# Altium PCB BD4_dy_V1.0.PcbDoc (part 2 of 2)
Units mil, origin at the board's own origin, x right, y up, seen from the top; angles counter-clockwise.
Board outline 5358.3 x 5259.87 mil, 4 copper layers (Top Layer, Signal Layer 1, Signal Layer 2, Bottom Layer), stack 30.634 mil thick; 170 components, 120 nets, 593 pads, 159 vias.
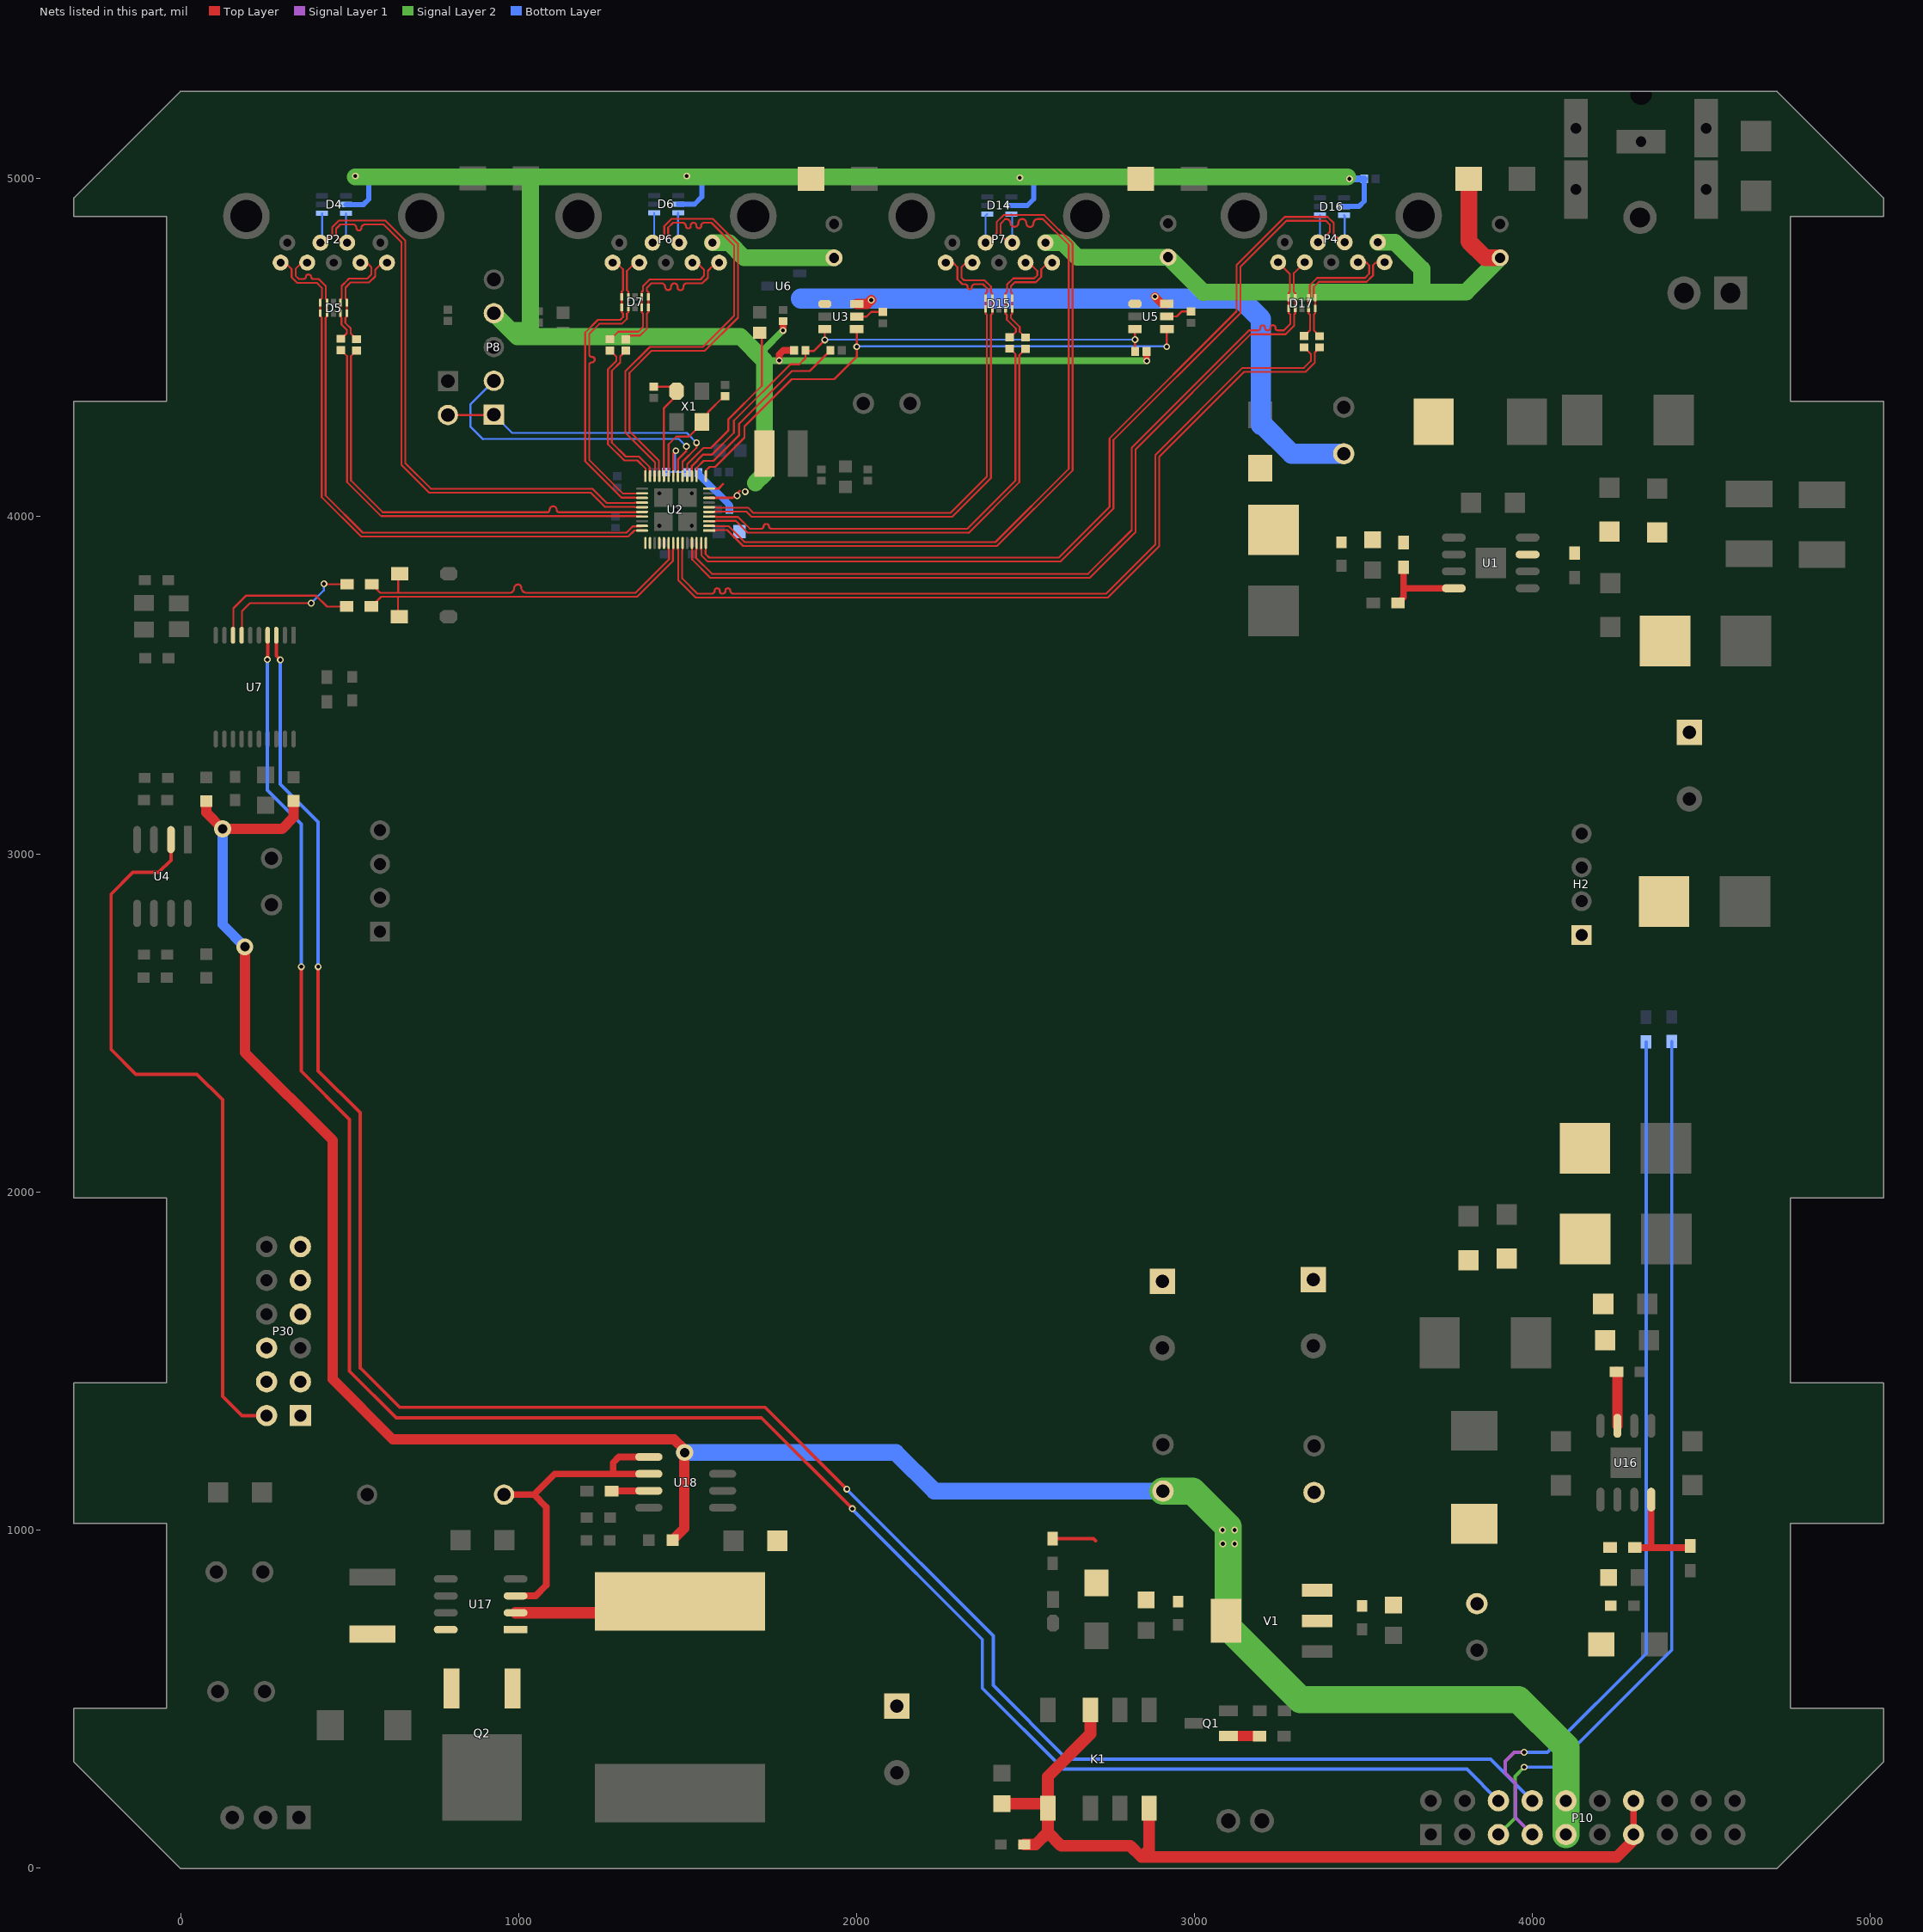
[diagram p4: the nets of this part, all layers, seen from the top]

## Via types
v1: diameter 20, hole 12, Top Layer to Bottom Layer, 141 vias
v2: diameter 24, hole 12, Top Layer to Bottom Layer, 8 vias
v3: diameter 50, hole 28, Top Layer to Bottom Layer, 5 vias
v4: diameter 20, hole 12, Top Layer to Bottom Layer, tented both sides, 5 vias

## Nets (pads, with @x,y where several pads share a name; then routed paths per layer and width w, separated by ;. In a path a pad name is that pad's centre, name@x,y a point inside that pad or via, vN(x,y) a via of type N, cw(c..) or ccw(c..) an arc to the next point about the centre after c; other vN are vias at no path point) (continued)
NetP10_5: P10.5 R19.2 | length 2612.4
  Signal Layer 2 w10: P10.5@3900.79,98.43 3950,147.64 3950,271 v1(3977,298)
  Bottom Layer w10: v1(3977,298) 4067,298 4414,645 R19.2@4414,2445.5
NetP10_6: P10.6 U7.4 | length 6292.2
  Top Layer w10: v1(256.46,3576) 257.23,3576.77 U7.4@257.23,3648 ; v1(357,2667) 357,2358 500,2215 500,1470 638,1332 1719,1332 v1(1988,1063)
  Bottom Layer w10: v1(256.46,3576) 256.46,3189.54 357,3089 v1(357,2667) ; v1(1988,1063) 1988,1061 2373,676 2373,532 2613,292 3807.21,292 P10.6@3900.79,198.43
NetP10_7: P10.7 R18.2 | length 2617.9
  Signal Layer 1 w10: v1(3977,342) 3948,342 3921,315 3921,281 3951,251 3951,148.21 P10.7@4000.79,98.43
  Bottom Layer w10: v1(3977,342) 4046,342 4338,634 R18.2@4338,2444.5 ; P10.7@4000.79,98.43 P10.7@4009.43,98.43
NetP10_8: P10.8 U7.3 | length 6358.1
  Top Layer w10: U7.3@282.82,3648 282.82,3587.18 v1(295,3575) ; v1(407,2667) 407,2359 531,2235 531,1480 648,1363 1730,1363 v1(1972,1121)
  Bottom Layer w10: v1(295,3575) 295,3207.31 407,3095.31 v1(407,2667) ; v1(1972,1121) 1972,1120 2405,687 2405,540 2623,322 3877.21,322 P10.8@4000.79,198.43
NetQ1_1: Q1.1 R13.2 | length 92
  Top Layer w30: Q1.1@3101.69,390.35 3102.04,390 R13.2@3193.5,390
NetQ2_1: Q2.1 U17.1
NetQ2_3: Q2.3 R47.1 U17.8
NetR2_2: R2.2 R3.1 U1.4 | length 261.2
  Top Layer w20: R3.1@3603.5,3744 3620,3760.5 3620,3787 ; R2.2@3620,3849.5 3620,3787 ; U1.4@3768.85,3787 3620,3787
NetR6_1: R6.1 U3.5 | length 82.4
  Top Layer w6: U3.5@2001.24,4591.27 2030.27,4591.27 2044,4605 R6.1@2078,4605
NetR8_1: R8.1 U5.5 | length 77.5
  Top Layer w6: U5.5@2919.49,4591.6 2948.6,4591.6 2963,4606 R8.1@2991,4606
NetR16_1: R16.1 U7.8 | length 444.6
  Top Layer w6: U7.8@154.87,3648 155.93,3649.06 155.93,3727.93 193,3765 401,3765 433,3733 R16.1@491.5,3733
NetR17_1: R17.1 U7.7 | length 427.8
  Top Layer w6: U7.7@180.46,3648 181.52,3649.06 181.52,3719.52 205,3743 v1(386,3743) ; v1(424,3800) 425,3799 R17.1@492.5,3799
  Bottom Layer w6: v1(386,3743) 424,3781 v1(424,3800)
NetR43_2: R43.2 R44.1 U16.4 | length 310.3
  Top Layer w20: R43.2@4304.5,948 4348,948 ; U16.4@4353,1089.85 4353,953 4348,948 ; R44.1@4469,952.5 4464.5,948 4348,948
NetR45_2: R45.2 U17.3 U18.5 U18.6 | length 987
  Top Layer w19.68: R45.2@957.26,1104.45 1045.55,1104.45 ; U17.3@991.35,805 1051,805 1082,836 1082,1068 1045.55,1104.45 ; U18.6@1385.85,1166 1280,1166 ; U18.5@1385.85,1216 1297,1216 1280,1199 1280,1166 ; 1045.55,1104.45 1107.1,1166 1280,1166
NetR48_1: R48.1 U18.7 | length 110.8
  Top Layer w20: R48.1@1275.5,1115 1276.5,1116 U18.7@1385.85,1116
OLED_CS: P30.7
OLED_DC: P30.9
OLED_RES: P30.11
OVCUR#: R7.2 R9.2 U2.14 U3.3 U5.3 | length 1628.9
  Top Layer w6: U2.14@1513.23,4118.98 1513.23,4149.23 1547,4183 1573,4183 1637.7,4247.7 1637.7,4283.1 1804.6,4450 1831,4450 1849.46,4468.46 1849.46,4489 1873.75,4489 v1(1906.75,4522) U3.3@1906.75,4553.87 ; U5.3@2825,4554.2 v1(2825,4523) 2825,4488.54 R9.2@2825.54,4488
  Bottom Layer w6: v1@1906.75,4523 v1(2825,4523) v1@2824,4522
P1_AS_DX_N: D6.6 P6.2 U2.22 | length 1369.1
  Top Layer w5.59: U2.22@1402.99,4118.98 1402.99,4139.51 1404.09,4140.6 1404.09,4159.72 1316.61,4247.2 1316.61,4429.21 1388.69,4501.29 1546.4,4501.29 1637.9,4592.8 1637.9,4801.8 1570.7,4869 1549.2,4869 ccw(c1549.2,4860.8) 1541,4860.8 1541,4859.2 cw(c1534.3,4859.2) 1534.3,4852.5 1533.5,4852.5 cw(c1533.5,4859.6) 1526.4,4859.6 1526.4,4861.3 ccw(c1518.7,4861.3) 1518.7,4869 1517.7,4869 ccw(c1517.7,4860.9) 1509.6,4860.9 1509.6,4858.3 cw(c1503.5,4858.3) 1503.5,4852.2 1502.3,4852.2 cw(c1502.3,4859.1) 1495.4,4859.1 ccw(c1485.5,4859.1) 1485.5,4869 1457.7,4869 1443,4854.3 1443,4830.2 1463.2,4810 P6.2@1475.57,4810
  Bottom Layer w5.59: D6.6@1472.43,4898.41 1472.43,4813.14 P6.2@1475.57,4810
P1_AS_DX_P: D6.1 P6.3 U2.21 | length 1369.6
  Top Layer w5.59: P6.3@1396.83,4810 1411.21,4810 1431.41,4830.2 1431.41,4859.1 1452.9,4880.59 1575.5,4880.59 1646.1,4809.99 1649.49,4806.6 1649.49,4587.99 1551.2,4489.7 1393.49,4489.7 1328.2,4424.41 1328.2,4252 1415.68,4164.52 1415.68,4140.6 1416.77,4139.51 U2.21@1416.77,4118.98
  Bottom Layer w5.59: P6.3@1396.83,4810 1401.57,4814.74 D6.1@1401.57,4898.41
P1_SS_RX_N: D7.2 D7.9 P6.6 U2.26 | length 895.4
  Top Layer w5.59: U2.26@1349.08,4067.8 1348.47,4067.19 1309.41,4067.19 1209.1,4167.5 1209.1,4447.8 cw(c1216.6,4447.8) 1216.6,4455.3 ccw(c1216.6,4464.3) 1225.6,4464.3 ccw(c1218.21,4464.3) 1218.21,4471.69 1216.93,4471.69 cw(c1216.93,4479.52) 1209.1,4479.52 1209.1,4539.4 1239.5,4569.8 1305.9,4569.8 1320.79,4584.69 1320.79,4599.9 1325.2,4604.31 1325.32,4604.31 D7.2@1325.32,4618.25 D7.9@1325.32,4649.75 1325.32,4664.78 1321,4669.1 1321,4726.1 1345.84,4750.94 P6.6@1357.46,4750.94
P1_SS_RX_P: D7.1 D7.10 P6.5 U2.27 | length 895.7
  Top Layer w5.59: P6.5@1278.72,4750.94 1289.26,4750.94 1309.41,4730.79 1309.41,4669.51 1305.63,4665.73 D7.10@1305.63,4649.75 D7.1@1305.63,4618.25 1305.63,4604.31 1309.2,4600.74 1309.2,4589.49 1301.1,4581.39 1234.7,4581.39 1197.51,4544.2 1197.51,4162.7 1200.9,4159.3 1304.31,4055.9 1304.61,4055.6 1349.4,4055.6 1349.9,4055.1 U2.27@1353.3,4055.1
P1_SS_TX_N: C38.2 U2.23 | length 456.6
  Top Layer w5.59: C38.2@1314.34,4490.34 1314.34,4486.54 1301.19,4473.39 1301.19,4455.39 1276.39,4430.59 1276.39,4218.21 1317.81,4176.79 1356.7,4176.79 1388.09,4145.4 1388.09,4133.81 1389.21,4132.69 U2.23@1389.21,4118.98
P1_SS_TX_P: C36.2 U2.24 | length 459.4
  Top Layer w5.59: C36.2@1271,4490.54 1271.66,4490.54 1289.6,4472.6 1289.6,4460.19 1264.8,4435.39 1264.8,4213.41 1313.01,4165.2 1351.9,4165.2 1376.5,4140.6 1376.5,4133.2 1375.43,4132.13 U2.24@1375.43,4118.98
P1C_N: C38.1 D7.5 D7.6 P6.9 | length 491.9
  Top Layer w5.59: C38.1@1317.1,4523.8 1328.31,4535.01 1359.61,4535.01 1380.29,4555.69 1380.29,4600.59 1384.37,4604.67 D7.5@1384.37,4618.25 D7.6@1384.37,4649.75 1384.37,4663.43 1380.32,4667.48 1380.32,4676.8 1393.03,4689.51 1423.49,4689.51 cw(c1423.49,4678.8) 1434.2,4678.8 ccw(c1443.3,4678.8) 1443.3,4669.7 ccw(c1443.3,4678) 1451.6,4678 1451.6,4679.71 cw(c1461.4,4679.71) 1461.4,4689.51 cw(c1461.4,4680.11) 1470.8,4680.11 1470.8,4677.7 ccw(c1479.3,4677.7) 1479.3,4669.2 ccw(c1479.3,4678.1) 1488.2,4678.1 1488.2,4679.91 cw(c1497.8,4679.91) 1497.8,4689.51 1543.6,4689.51 1560.49,4706.4 1560.49,4726.69 1574.33,4740.53 P6.9@1574.33,4750.94
P1C_P: C36.1 D7.4 D7.7 P6.8 | length 491.4
  Top Layer w5.59: C36.1@1271,4524 1272.6,4524 1295.2,4546.6 1354.81,4546.6 1368.7,4560.49 1368.7,4600.3 1364.69,4604.31 D7.4@1364.69,4618.25 D7.7@1364.69,4649.75 1364.69,4664.19 1368.73,4668.23 1368.73,4681.6 1388.23,4701.1 1538.8,4701.1 1548.9,4711.2 1548.9,4730.4 1528.36,4750.94 P6.8@1514.94,4750.94
P2_AS_DX_N: D14.6 P7.2 U2.2 | length 2292.4
  Top Layer w5.59: U2.2@1564.16,3971.77 1584.68,3971.77 1585.77,3970.68 1622.7,3970.68 1669.58,3923.8 2411.71,3923.8 2628.6,4140.69 2628.6,4803.2 2551.8,4880 2537.8,4880 ccw(c2537.8,4866.4) 2524.2,4866.4 cw(c2514.3,4866.4) 2514.3,4856.5 cw(c2514.3,4867.6) 2503.2,4867.6 ccw(c2490.8,4867.6) 2490.8,4880 ccw(c2490.8,4869.1) 2479.9,4869.1 cw(c2467.5,4869.1) 2467.5,4856.7 cw(c2467.5,4868.1) 2456.1,4868.1 ccw(c2444.2,4868.1) 2444.2,4880 2440.7,4880 2426.9,4866.2 2426.9,4833.1 2450,4810 P7.2@2461.57,4810
  Bottom Layer w5.59: D14.6@2458.43,4894.41 2461.57,4891.27 P7.2@2461.57,4810
P2_AS_DX_P: D14.1 P7.3 U2.1 | length 2292.7
  Top Layer w5.59: U2.1@1564.16,3957.99 1584.68,3957.99 1585.77,3959.09 1617.9,3959.09 1664.78,3912.21 2416.51,3912.21 2640.19,4135.89 2640.19,4808 2556.6,4891.59 2435.9,4891.59 2415.31,4871 2415.31,4837.01 2388.3,4810 P7.3@2382.83,4810
  Bottom Layer w5.59: P7.3@2382.83,4810 2382.83,4889.67 D14.1@2387.57,4894.41
P2_SS_RX_N: D15.1 D15.10 P7.5 U2.6 | length 1626.6
  Top Layer w5.59: U2.6@1564.16,4026.89 1584.68,4026.89 1585.77,4025.8 1679.4,4025.8 1695.11,4010.09 2278.59,4010.09 2386.8,4118.3 2386.8,4596.14 2382.83,4600.11 D15.1@2382.83,4614.05 D15.10@2382.83,4645.55 2382.83,4659.23 2386.88,4663.28 2386.88,4675.1 2374.98,4687 2351.3,4687 ccw(c2351.3,4677.2) 2341.5,4677.2 cw(c2336.2,4677.2) 2336.2,4671.9 cw(c2336.2,4678.6) 2329.5,4678.6 2329.5,4679.5 ccw(c2322,4679.5) 2322,4687 2314.11,4687 2299.41,4701.7 2299.41,4737.39 2285.86,4750.94 P7.5@2264.72,4750.94
P2_SS_RX_P: D15.2 D15.9 P7.6 U2.5 | length 1625.8
  Top Layer w5.59: U2.5@1564.16,4013.11 1584.68,4013.11 1585.77,4014.21 1674.6,4014.21 1690.31,3998.5 2283.39,3998.5 2398.39,4113.5 2398.39,4595.98 2402.52,4600.11 D15.2@2402.52,4614.05 D15.9@2402.52,4645.55 2402.52,4658.88 2398.47,4662.93 2398.47,4679.9 2379.78,4698.59 2318.91,4698.59 2311,4706.5 2311,4736.9 2325.04,4750.94 P7.6@2343.46,4750.94
P2_SS_TX_N: C21.2 U2.4 | length 1398.4
  Top Layer w5.59: U2.4@1564.16,3999.33 1583.58,3999.33 cw(c1583.58,3998.24) 1584.68,3998.24 1649.66,3998.24 1684.41,3963.49 1718.89,3963.49 ccw(c1718.89,3969.9) 1725.3,3969.9 cw(c1732.6,3969.9) 1732.6,3977.2 1735.1,3977.2 cw(c1735.1,3971.3) 1741,3971.3 ccw(c1748.81,3971.3) 1748.81,3963.49 2328.99,3963.49 2471.11,4105.61 2471.11,4479.99 2454.66,4496.44 2453.9,4496.44 C21.2@2450.4,4496.44
P2_SS_TX_P: C23.2 U2.3 | length 1398.5
  Top Layer w5.59: U2.3@1564.16,3985.55 1583.58,3985.55 ccw(c1583.58,3986.65) 1584.68,3986.65 1643.55,3986.65 1678.3,3951.9 2332.21,3951.9 2333,3951.11 2482.7,4100.81 2482.7,4476.94 C23.2@2501.4,4495.64
P2C_N: C23.1 D15.5 D15.6 P7.9 | length 341.6
  Top Layer w5.59: C23.1@2505.4,4529.9 2501.4,4529.9 2500.2,4529.9 2483.69,4546.4 2483.69,4560.6 2457.4,4586.9 2457.4,4595.94 2461.57,4600.11 D15.5@2461.57,4614.05 D15.6@2461.57,4645.55 2461.57,4659.93 2457.52,4663.98 2457.52,4681.02 2469.2,4692.7 2531.3,4692.7 2547.29,4708.69 2547.29,4730.99 2567.24,4750.94 P7.9@2579.68,4750.94
P2C_P: C21.1 D15.4 D15.7 P7.8 | length 341.5
  Top Layer w5.59: C21.1@2450.4,4529.9 2453.9,4529.9 2456.3,4529.9 2472.1,4545.7 2472.1,4555.8 2445.81,4582.1 2445.81,4596.19 2441.89,4600.11 D15.4@2441.89,4614.05 D15.7@2441.89,4645.55 2441.89,4659.89 2445.93,4663.94 2445.93,4685.83 2464.4,4704.29 2526.5,4704.29 2535.7,4713.49 2535.7,4726.2 2510.96,4750.94 P7.8@2500.94,4750.94
P3_AS_DX_N: D16.6 P4.2 U2.48 | length 2678.5
  Top Layer w5.59: U2.48@1554.57,3921.02 1554.57,3900.51 1553.47,3899.41 1553.47,3888.7 1564.47,3877.7 2599.4,3877.7 2749.8,4028.1 2749.8,4230.7 3125.9,4606.8 3125.9,4743.9 3268.39,4886.39 3394.9,4886.39 3413.09,4868.2 3413.09,4834.51 3436.6,4811 P4.2@3445.57,4811
  Bottom Layer w5.59: D16.6@3443.43,4891.41 3445.57,4889.27 P4.2@3445.57,4811
P3_AS_DX_P: D16.1 P4.3 U2.47 | length 2678.2
  Top Layer w5.59: U2.47@1540.79,3921.02 1540.79,3900.51 1541.88,3899.41 1541.88,3883.9 1559.67,3866.11 2604.2,3866.11 2758,4019.9 2761.39,4023.3 2761.39,4225.9 3137.49,4602 3137.49,4739.1 3273.19,4874.8 3390.1,4874.8 3401.5,4863.4 3401.5,4841.3 3371.2,4811 P4.3@3366.83,4811
  Bottom Layer w5.59: P4.3@3366.83,4811 3372.57,4816.74 D16.1@3372.57,4891.41
P3_SS_RX_N: D17.2 D17.9 P4.6 U2.45 | length 2509.6
  Top Layer w5.59: U2.45@1513.23,3921.02 1513.23,3900.51 1514.32,3899.41 1514.32,3871.89 1568,3818.21 2690.9,3818.21 2826.99,3954.3 2826.99,4198.4 3167.39,4538.8 3270.6,4538.8 3296.29,4564.49 3296.29,4598.28 3299.32,4601.31 D17.2@3299.32,4615.25 D17.9@3299.32,4646.75 3299.32,4660.08 3295.27,4664.13 3295.27,4719.75 P4.6@3327.46,4751.94
P3_SS_RX_P: D17.1 D17.10 P4.5 U2.46 | length 2510
  Top Layer w5.59: U2.46@1527.01,3921.02 1527.01,3900.51 1525.91,3899.41 1525.91,3876.69 1572.8,3829.8 2686.1,3829.8 2815.4,3959.1 2815.4,4203.2 3162.59,4550.39 3189.4,4550.39 ccw(c3189.4,4557.09) 3196.1,4557.09 3196.1,4558.7 cw(c3202.3,4558.7) 3202.3,4564.9 3203.7,4564.9 cw(c3203.7,4558.7) 3209.9,4558.7 3209.9,4557.6 ccw(c3217.11,4557.6) 3217.11,4550.39 3218.6,4550.39 ccw(c3218.6,4558.19) 3226.4,4558.19 3226.4,4559 cw(c3233,4559) 3233,4565.6 3234.2,4565.6 cw(c3234.2,4559.2) 3240.6,4559.2 3240.6,4557.6 ccw(c3247.81,4557.6) 3247.81,4550.39 3265.8,4550.39 3284.7,4569.29 3284.7,4597.3 3280.69,4601.31 3279.63,4601.31 D17.1@3279.63,4615.25 D17.10@3279.63,4646.75 3279.63,4660.63 3283.68,4664.68 3283.68,4716.99 P4.5@3248.72,4751.94
P3_SS_TX_N: C37.2 U2.42 | length 2514.7
  Top Layer w5.59: U2.42@1471.89,3921.02 1471.89,3900.51 1472.98,3899.41 1472.98,3811.22 1521.4,3762.8 1524.8,3759.41 2744.2,3759.41 2747.6,3762.8 2893.3,3908.5 2896.69,3911.9 2896.69,4176.4 3147.99,4427.7 3329.9,4427.7 3340.8,4438.6 3353.7,4451.5 3357.09,4454.89 3357.09,4484.69 3371.94,4499.54 C37.2@3377,4499.54
P3_SS_TX_P: C35.2 U2.43 | length 2515.3
  Top Layer w5.59: U2.43@1485.67,3921.02 1485.67,3900.51 1484.57,3899.41 1484.57,3816.03 1529.6,3771 1571.6,3771 ccw(c1571.6,3780) 1580.6,3780 cw(c1587.5,3780) 1587.5,3786.9 1588.9,3786.9 cw(c1588.9,3780.2) 1595.6,3780.2 1595.6,3778.7 ccw(c1603.3,3778.7) 1603.3,3771 1604.2,3771 ccw(c1604.2,3779.3) 1612.5,3779.3 1612.5,3780.6 cw(c1618.8,3780.6) 1618.8,3786.9 1620.3,3786.9 cw(c1620.3,3780.4) 1626.8,3780.4 ccw(c1636.2,3780.4) 1636.2,3771 2739.4,3771 2885.1,3916.7 2885.1,4181.2 3143.19,4439.29 3325.1,4439.29 3345.5,4459.7 3345.5,4481.2 3327.16,4499.54 3326,4499.54 C35.2@3322,4499.54
P3C_N: C37.1 D17.5 D17.6 P4.9 | length 411.9
  Top Layer w5.59: C37.1@3371.8,4533.3 3354.69,4550.4 3354.69,4597.63 3358.37,4601.31 D17.5@3358.37,4615.25 D17.6@3358.37,4646.75 3354.32,4650.79 3354.32,4679.2 3369.23,4694.1 3510.69,4694.1 3526.4,4709.8 3529.79,4713.2 3529.79,4743.49 3537.2,4750.9 P4.9@3562.64,4750.9
P3C_P: C35.1 D17.4 D17.7 P4.8 | length 411.9
  Top Layer w5.59: C35.1@3326,4533.8 3343.1,4550.9 3343.1,4596.89 3338.69,4601.31 D17.4@3338.69,4615.25 D17.7@3338.69,4646.75 3342.73,4650.79 3342.73,4684 3364.42,4705.69 3505.89,4705.69 3518.2,4718 3518.2,4742.4 3508.66,4751.94 P4.8@3484.94,4751.94
P4_AS_DX_N: R16.2 U2.41 VD2.1 | length 1062.9
  Top Layer w5.59: R16.2@564.5,3733 593.61,3762.11 643,3762.11 ; VD2.1@647.17,3703 643,3707.17 643,3762.11 ; U2.41@1458.11,3921.02 1458.11,3900.51 1457.02,3899.41 1457.02,3867.8 1351.33,3762.11 643,3762.11
P4_AS_DX_P: R17.2 U2.40 VD1.1 | length 1060.6
  Top Layer w5.59: R17.2@565.5,3799 590.8,3773.7 644.1,3773.7 ; VD1.1@644.1,3825.93 644.1,3773.7 ; U2.40@1444.33,3921.02 1444.33,3900.51 1445.43,3899.41 1445.43,3872.6 1346.53,3773.7 1023.8,3773.7 cw(c1023.8,3789.8) 1007.7,3789.8 ccw(c999.2,3789.8) 999.2,3798.3 998.8,3798.3 ccw(c998.8,3786.3) 986.8,3786.3 cw(c974.2,3786.3) 974.2,3773.7 644.1,3773.7
P4_SS_RXA: U2.39
P4_SS_RXB: U2.38
P4_SS_TXA: U2.36
P4_SS_TXB: U2.35
PWR_CC/GPIO0/BC_EN#: R10.2 U2.13 | length 584.5
  Top Layer w6: U2.13@1527.01,4118.98 1527.01,4143.01 1548,4164 1577,4164 1653.2,4240.2 1653.2,4274 1809.2,4430 1862.54,4430 R10.2@1923.54,4491
PWREN#: U2.11 U3.4 U5.4 | length 1674.2
  Top Layer w6: U2.11@1554.57,4118.98 1554.57,4135.57 1565.41,4146.41 1582,4146.41 1668.7,4233.11 1668.7,4266 1808.7,4406 1935,4406 2001.24,4472.24 v1(2001.24,4502) U3.4@2001.24,4553.87 ; v1(2919,4502) 2919,4553.71 U5.4@2919.49,4554.2
  Bottom Layer w6: v1@2001.24,4503 2918,4503 v1(2919,4502)
RESET#: C11.2 R5.1 U2.18 | length 211.5
  Top Layer w6: U2.18@1458.11,4118.98 1458.11,4186.11 v1(1466,4194)
  Bottom Layer w6: C11.2@1436.46,4131 1463,4131 ; v1@1463,4194 v1@1463,4200 ; v1(1466,4194) 1463,4191 1463,4131 ; R5.1@1499,4130 1498,4131 1463,4131
SMBCLK/SCL/EXCH#: P1.2 P8.1 U2.16 | length 886.9
  Top Layer w6: P1.2@791,4300 926,4300 P8.1@927,4301 ; U2.16@1485.67,4118.98 1485.67,4161.67 1527,4203 v1(1527,4218)
  Bottom Layer w6: P8.1@927,4301 981,4247 1498,4247 v1(1527,4218)
SMBDAT/SDA: P8.2 U2.17 | length 927
  Top Layer w6: U2.17@1471.89,4118.98 1471.89,4167.89 1496,4192 v1@1496,4207
  Bottom Layer w6: 895,4228 894,4229 ; P8.2@927,4401 858,4332 858,4265 894,4229 ; v1(1497,4207) 1475,4229 894,4229
SPI_MISO_2: P30.1
SPI_MOSI_2: P30.2 U4.2 | length 2162.4
  Top Layer w10: U4.2@-29,3043.15 -29,2982 -65,2946 -142,2946 -206,2882 -206,2422 -133,2349 48,2349 124,2273 124,1396 181.42,1338.58 P30.2@254.33,1338.58
SPI_SCK_2: P30.3
SUSP/PDHUB#: LED2.2 U2.15 | length 531.3
  Top Layer w6: U2.15@1499.45,4118.98 1499.45,4154.45 1547.48,4202.48 1569.35,4202.48 1621.4,4254.53 1621.4,4287.4 1720.3,4386.3 1720.3,4537.07 LED2.2@1714,4543.37
SWITCH_IN01: P30.6
SWITCH_IN02: P30.4
UP_AS_DX_N: D4.6 P2.2 U2.29 | length 1814.2
  Top Layer w5.59: P2.2@492.57,4810 481.2,4810 460.3,4830.9 460.3,4851.2 472.9,4863.8 510.4,4863.8 cw(c510.4,4854.3) 519.9,4854.3 519.9,4853.7 ccw(c527.8,4853.7) 527.8,4845.8 ccw(c527.8,4852.8) 534.8,4852.8 cw(c545.8,4852.8) 545.8,4863.8 601,4863.8 653.41,4811.39 653.41,4152.39 735.61,4070.19 1213.81,4070.19 1255.81,4028.19 1343.98,4028.19 1345.28,4026.89 U2.29@1365.84,4026.89
  Bottom Layer w5.59: D4.6@489.43,4897.41 489.43,4813.14 P2.2@492.57,4810
UP_AS_DX_P: D4.1 P2.3 U2.28 | length 1815.3
  Top Layer w5.59: P2.3@413.83,4810 427.1,4810 448.71,4831.61 448.71,4856 468.1,4875.39 594.21,4875.39 605.8,4875.39 665,4816.19 665,4157.19 740.41,4081.78 1218.61,4081.78 1260.61,4039.78 1344.39,4039.78 1345.28,4040.67 U2.28@1365.84,4040.67
  Bottom Layer w5.59: P2.3@413.83,4810 418.57,4814.74 D4.1@418.57,4897.41
UP_SS_RX_N: D5.2 D5.9 P2.6 U2.33 | length 1793.4
  Top Layer w5.59: P2.6@374.46,4750.94 358.94,4750.94 340.09,4732.09 340.09,4712.1 349.5,4702.69 364.09,4702.69 ccw(c364.09,4709.4) 370.8,4709.4 cw(c377,4709.4) 377,4715.6 378.7,4715.6 cw(c378.7,4707.7) 384.17,4713.4 cw(c378.7,4707.7) 386.6,4707.7 ccw(c391.61,4707.7) 391.61,4702.69 408,4702.69 429.29,4681.4 429.29,4644.11 433.02,4640.38 D5.9@433.02,4632.45 D5.2@433.02,4600.95 433.02,4591.52 429.09,4587.59 429.09,4061.51 538.91,3951.69 1319.69,3951.69 1337.58,3969.58 1337.79,3969.58 ; 1337.1,3968.89 1337.79,3969.58 ; U2.33@1365.84,3971.77 1364.4,3970.33 1346.55,3970.33 1346.11,3969.89 1338.1,3969.89 1337.79,3969.58
UP_SS_RX_P: D5.1 D5.10 P2.5 U2.34 | length 1794.7
  Top Layer w5.59: P2.5@295.72,4750.94 309.16,4750.94 328.5,4731.6 328.5,4707.3 344.7,4691.1 403.2,4691.1 417.7,4676.6 417.7,4646 413.33,4641.63 D5.10@413.33,4632.45 D5.1@413.33,4600.95 413.33,4592.07 417.5,4587.9 417.5,4056.71 534.11,3940.1 1324.7,3940.1 1342.9,3958.3 1365.53,3958.3 U2.34@1365.84,3957.99
UP_SS_TX_N: C13.2 U2.30 | length 1312.6
  Top Layer w5.59: C13.2@520.5,4490.5 504,4474 504,4106.2 598.18,4012.02 1085,4012.02 ccw(c1085,4018.82) 1091.8,4018.82 cw(c1102.7,4018.82) 1102.7,4029.72 cw(c1102.7,4019.52) 1112.9,4019.52 ccw(c1120.4,4019.52) 1120.4,4012.02 1348.72,4012.02 1349.81,4013.11 U2.30@1365.84,4013.11
UP_SS_TX_P: C12.2 U2.31 | length 1313.5
  Top Layer w5.59: C12.2@474.6,4491.84 492.41,4474.03 492.41,4101.4 593.38,4000.43 1348.57,4000.43 1349.67,3999.33 U2.31@1365.84,3999.33
UPC_N: C13.1 D5.5 D5.6 P2.9 | length 335.4
  Top Layer w5.59: C13.1@520.5,4524.3 503.2,4541.6 503.2,4556.7 487.59,4572.31 487.59,4586.99 492.07,4591.47 D5.5@492.07,4600.95 D5.6@492.07,4632.45 492.07,4641.33 488.02,4645.38 488.02,4677.05 502.97,4692 557.4,4692 575.6,4710.2 575.6,4729.9 596.64,4750.94 P2.9@610.68,4750.94 ; C13.1@521.7,4525.5 C13.1@522.2,4525
UPC_P: C12.1 D5.4 D5.7 P2.8 | length 335
  Top Layer w5.59: C12.1@474.6,4525.3 491.61,4542.31 491.61,4551.9 476,4567.51 476,4587.5 472.39,4591.11 D5.4@472.39,4600.95 D5.7@472.39,4632.45 472.39,4641.59 476.43,4645.64 476.43,4681.86 495.07,4700.49 498.17,4703.59 552.6,4703.59 564.01,4715 564.01,4738.09 551.16,4750.94 P2.8@531.94,4750.94
USB_5V: C2.1 C3.2 C4.2 D2.2 D19.1 L1.2 R2.1 U3.6 U5.6 U6.2 | length 2075.3
  Top Layer w25: v1(2883.66,4650.65) 2905.31,4629 U5.6@2919.49,4629
  Top Layer w30: U3.6@2001.24,4628.67 2032.67,4628.67 v1(2044,4640)
  Bottom Layer w60: U6.2@1836,4645 2044,4645 2883.66,4645 3137,4645 3198,4584 3198,4276.4 ; 3198,4271 3198,4276.4 ; C2.1@3443,4185.1 3289.3,4185.1 3198,4276.4
VBUS_OUT1: C32.1 D22.2 P6.1 U3.1 | length 378.6
  Signal Layer 2 w50: P6.1@1574,4810 1623,4810 1668,4765 C32.1@1934,4765
VBUS_OUT2: C17.1 C31.1 D20.2 D21.2 P4.1 P7.1 U5.1 | length 1978.6
  Top Layer w50: D20.2@3813.26,4999 3813.26,4813.74 3862,4765 C31.1@3906,4765
  Signal Layer 2 w50: P7.1@2560,4810 2611,4810 2654,4767 C17.1@2923,4767 3025.97,4664.03 ; 3026.97,4663.03 3025.97,4664.03 ; P4.1@3544,4811 3595,4811 3674,4732 3674,4664.03 ; C31.1@3906,4765 3805.03,4664.03 3674,4664.03 ; 3025.97,4664.03 3674,4664.03
VCC_3.3V: C82.2 C83.2 C89.1 D13.2 L3.1 L4.1 L12.1 P10.9 P10.10 R46.2 V1.2 | length 7080.9
  Top Layer w10: R46.2@2581,974.5 2701.5,974.5 2708,968
  Top Layer w30: L4.1@76,3157 76,3123 v3(124.12,3074.88) 299.88,3074.88 334,3109 L3.1@334,3158 ; v3(190,2726) 190,2413 450,2153 450,1446 628,1268 1461,1268 1491,1238 1491,1229 1491,1005 L12.1@1456,970
  Signal Layer 2 w80: C89.1@2908,1115.1 2994.9,1115.1 3097,1013 3101,1009 3101,1000 3101,959 3101,712 3315,498 3960,498 4100.79,357.21 P10.10@4100.79,198.43 P10.9@4100.79,98.43
  Bottom Layer w30: v3(124.12,3074.88) 124.12,2791.88 v3(190,2726)
  Bottom Layer w50: v3(1492,1229) 2117,1229 2230.9,1115.1 C89.1@2908,1115.1
  other v1: 3085,959 3120,959 3084,1000 3120,1000
VCC_5V: C16.2 C20.2 C66.2 C67.1 C68.2 C79.1 C80.2 C81.2 D12.2 K1.1 K1.4 K1.7 L10.2 P10.13 P10.14 R43.1 V1.3 | length 2696.4
  Top Layer w19.68: P10.13@4300.79,98.43 P10.14@4300.79,198.43
  Top Layer w35: C16.2@2431,190 2553.63,190 K1.1@2567,176.63 ; C20.2@2497,69 2531,69 2567,105 ; K1.7@2693.38,467.37 2693.38,396.38 2567,270 K1.1@2567,176.63 ; K1.4@2866.61,176.63 2866.61,54.61 2844,32 ; P10.13@4300.79,98.43 4300.79,81.79 4251,32 2844,32 ; 2567,105 2607,65 2811,65 2844,32 ; 2567,105 K1.1@2567,176.63
VDD33: C18.1 C19.2 C47.2 C48.2 C49.2 C50.2 D4.5 D6.5 D14.5 D16.5 P8.4 R5.2 R7.1 R9.1 R12.2 U2.8 | length 7088.9
  Top Layer w7: U2.8@1564.16,4054.45 1634.45,4054.45 1644,4064 1655,4075
  Top Layer w20: v1(1772,4461) 1772,4479 1784,4491 R7.1@1816,4491 ; v1(1783,4550) R12.2@1783,4576.54 ; R9.1@2859,4488 2859,4461 v1(2860,4460)
  Signal Layer 2 w20: v1(1783,4550) 1728,4495 1728,4461 v1(1772,4461) 2859,4461 v1(2860,4460)
  Signal Layer 2 w50: v1@517,5005 1035,5005 ; P8.4@927,4601 996,4532 1657,4532 1728,4461 1728,4126 1701,4099 ; 980,4550 1035,4550 1035,5005 ; v1@3454,5005 2484,5005 1498,5005 1035,5005
  Bottom Layer w15: D4.5@489.43,4923 541,4923 556.54,4938.54 C47.2@556.54,5007 ; D6.5@1472.43,4924 1521,4924 1542.54,4945.54 C48.2@1542.54,5006 ; 1577,4080 1603.7,4053.3 1604.94,4053.3 ; D14.5@2458.43,4920 2506,4920 2525.22,4939.22 2525.22,5001.68 C49.2@2525.22,5002 ; D16.5@3443.43,4917 3488,4917 3503.54,4932.54 C50.2@3503.54,4998.38
  Bottom Layer w20: v1(517,5007) C47.2@556.54,5007 ; v1(1498,5007) 1541.54,5007 C48.2@1542.54,5006 ; R5.2@1532.46,4130 1532.46,4124.54 1551.88,4105.12 ; 1577,4080 1551.88,4105.12 ; C19.2@1624.46,4020 1624.46,4033.77 1604.94,4053.3 1553.11,4105.12 1551.88,4105.12 ; v1(2484,5002) C49.2@2525.22,5002 ; v1(3460,4999) 3502.92,4999 C50.2@3503.54,4998.38
  other v4: 1647,4061 1671,4073
VIN1_12V: C70.2 C71.2 C72.1 C73.1 C74.2 C75.2 D9.2 R42.2 U16.7 | length 160.9
  Top Layer w30: R42.2@4250.5,1468 4253,1465.5 U16.7@4253,1308.15
VIN2_12V: C78.1 C84.2 D8.2 L11.1 U17.2 | length 453.2
  Top Layer w35: U17.2@991.35,755 L11.1@1444.53,755
VIN4_12V: C6.2 C7.2 C8.1 D1.2 R1.2 U1.7
VIN5_12V: D3.2 H2.1
VSW: L2.1 U2.10 | length 46.9
  Top Layer w7: U2.10@1564.16,4082.01 1592.01,4082.01 1605.5,4095.5
XI: C33.1 U2.20 X1.1 | length 376.2
  Top Layer w6: C33.1@1400,4384 1454,4384 X1.1@1468,4370 ; U2.20@1430.55,4118.98 1430.55,4320.55 1474,4364 1482,4372 X1.1@1468,4370 ; X1.1@1479,4377 1472.67,4370.67 1472,4370 X1.1@1468,4370
XO: C34.2 U2.19 X1.3 | length 341.8
  Top Layer w6: U2.19@1444.33,4118.98 1444.33,4213.33 1467,4236 1505,4236 1545.63,4276.63 1550.45,4281.45 X1.3@1556.8,4281.45 ; X1.3@1542.8,4279.45 1561,4297.65 1561,4308 1608.54,4355.54 C34.2@1612,4355.54
pads on no net: D4.3 D4.4 D6.3 D6.4 D14.3 D14.4 D16.3 D16.4 H3.1 P9.2 P30.5 P30.8 P30.10 P30.12 U1.2 U1.3 U4.3 U4.6 U7.1 U7.2 U7.5 U7.14 U7.15 U7.16 U7.17 U7.18 U16.2 U16.3

## Polygon pours and split planes (outlines as drawn)
GND on Top Layer "Keep-Out Layer-No Net" (solid, remove dead copper, pour order 10): 1421.5,4206.3 1421.1,4206.7 1408.1,4206.7 1408.1,4208.3 1355.7,4260.7 1355,4261.4 1355,4399.4 1355,4414.6 1400.3,4459.9 1540.1,4459.9 1689.8,4459.9 1688.37,4458.47 1688.37,4373.37 1688.37,4372.38 1606.52,4290.53 1605.82,4289.83 1605.82,4251.95 1580.89,4227.02 1579.97,4226.1 1469.1,4226.1 1466.7,4226.1 1447.9,4207.3
VSW on Top Layer "Keep-Out Layer-No Net" (solid, remove dead copper, pour order 13): 1558.16,4079.01 1594.01,4079.01 1596,4081 1636,4121 1688,4121 1693,4121 1717,4145 1717,4205 1682.15,4205
VDD33 on Top Layer "Keep-Out Layer-No Net" (solid, remove dead copper, pour order 14): 1617.17,4051.45 1618.05,4050.62 1664.85,4050.62 1664.85,4051.45 1685.15,4070.55 1685.15,4081.35 1655.13,4081.35 1654.25,4082.18 1622.47,4052.28 1616.29,4052.28
5V on Top Layer "Keep-Out Layer-No Net" (solid, remove dead copper, pour order 15): 1598,4066 1629,4066 1630,4066 1653,4089 1654,4090 1680,4090 1680,4115 1640,4115 1639.77,4115 1593,4068.23
DVDD12 on Top Layer "Keep-Out Layer-No Net" (solid, remove dead copper, pour order 12): 1675.32,4037 1774,4037 1776,4037 1810,4071 1813,4074 1858,4074 1858,4172 1857,4173 1800,4173 1796,4173 1795,4172 1795,4120 1795,4119 1759,4083 1732.34,4056.34 1728,4056.34 1687.49,4056.34 1671.73,4040.59
DVDD12 on Signal Layer 2 "Keep-Out Layer-No Net" (solid, remove dead copper, pour order 9): 1701,4060.5 1757,4060.5 1765,4052.5 1768,4049.5 1768,3946.5 1768,3893.5 1743,3868.5 1739,3864.5 1330,3864.5 1328,3864.5 1302,3890.5 1303,3891.5 1303,4098.5 1303,4105.5 1310,4112.5 1311,4113.5 1333,4113.5 1343,4113.5 1349,4107.5 1349,3952.5 1349,3931.5 1374,3906.5 1504,3906.5 1673,3906.5 1695,3928.5 1695,4051.5
GND on Signal Layer 2 "Top Layer-No Net" (solid, remove dead copper, pour order 11): 4740,64 4740,52 4701,13 4253,13 60,13 1,72 -2,75 -2,1980 -2,1993 -53,2044 -85,2076 -240,2076 -243,2076 -284,2117 -278,2123 -278,4135 -278,4193 -209,4262 -199,4252 -70,4252 -28,4252 13,4293 13,5088 13,5175 57,5219 69,5231 4601,5231 4699,5231 4761,5169 4737,5193 4734,5193 4737,5193 4741,5189 4741,4341 4741,4334 4750,4325 4761,4314 4969,4314 4982,4314 4996,4300 5014,4282 5014,2074 5014,2067 4981,2034 4974,2027 4763,2027 4761,2027 4741,2007 4745,2003 4745,1912 4745,58 4739,52
GND on Signal Layer 1 "Top Layer-No Net" (solid, remove dead copper, pour order 10): 4740,64 4740,52 4701,13 4253,13 60,13 1,72 -2,75 -2,1980 -2,1993 -53,2044 -85,2076 -240,2076 -243,2076 -284,2117 -278,2123 -278,4135 -278,4193 -209,4262 -199,4252 -70,4252 -28,4252 13,4293 13,5088 13,5175 57,5219 69,5231 4601,5231 4699,5231 4761,5169 4737,5193 4734,5193 4737,5193 4741,5189 4741,4341 4741,4334 4750,4325 4761,4314 4969,4314 4982,4314 4996,4300 5014,4282 5014,2074 5014,2067 4981,2034 4974,2027 4763,2027 4761,2027 4741,2007 4745,2003 4745,1912 4745,58 4739,52

## Keep-outs
Keep-Out Layer:
  circle w3.94: c925,3425 r118.11
  circle w3.94: c925,2441 r118.11
  circle w3.94: c3799,2441 r118.11
  circle w3.94: c3799,3425 r118.11
  circle w3.94: c2362,2832 r344.49

## Other copper
Top Layer:
  rectangle net GND: 96,80.9 191.5,202
  rectangle net GND: 3357.2,4265.3 3518.9,4357.4
  rectangle net GND: 3163.2,4265.3 3491.7,4340.2
  rectangle net GND: 4168,68 4239,272
  rectangle net GND: 4364,48.43 4550.79,267
  rectangle net NetD1_1: 4557,2781 4735,3630
  rectangle net GND: 1443,4000 1483,4038
  rectangle net GND: 1885,4129 2049,4158
  rectangle net GND: 4125,4980 4541,5042
  rectangle net GND: 4491,5022 4548,5083
  rectangle net GND: 4105,5026 4164,5081
  rectangle net GND: 4105,5064 4716,5191
  rectangle net GND: 4308,4115 4481,4359
  rectangle net GND: 4178,4035 4481,4165
  rectangle net GND: 3420,3812 3551,3869
  rectangle net GND: 3369.4,3728 3553,3829
  rectangle net GND: 145,3120 270,3169
  rectangle net GND: 4313,1541 4472,1696
  rectangle net GND: 4444,1007 4510,1162
  rectangle net GND: 4293,759 4360,883
  rectangle net GND: 4322,626 4484,899
  rectangle net GND: 4293,850 4319,883
  rectangle net GND: 2567,640 3003,745
  rectangle net GND: 3271,1457 3786,1600
  rectangle net GND: 2826,1211 3483,1606
  rectangle net GND: 3736,1903 3956,1962
  rectangle net GND: 3474,627 3626,708
  rectangle net GND: 3321,619 3854,674
  rectangle net GND: 1556,914 1666,1000
  rectangle net GND: 1180,952 1219,1133
  rectangle net GND: 500.94,837.02 636,930
  rectangle net GND: 48,80.5 154,1160
  rectangle net NetD10_2: 4584,4730 4730,4999
  rectangle net VCC_3.3V: 3078,641 3206,1148
  rectangle net VBUS_OUT2: 2810,4742 2928,4792
  rectangle net VBUS_OUT2: 2802,4622 2855,5005
  rectangle net VBUS_OUT1: 1890,4739 1946,4789
  rectangle net VBUS_OUT1: 1887,4626 1923,4789
  rectangle net VIN2_12V: 2033,438 2216,1782
  region net VIN2_12V: 2153.92,1661.08 2553.92,2061.08 2433,2182 2033,1782
  rectangle net VIN2_12V: 2433,2011 4226,2182
  region net VCC_3.3V: 3491.84,498.84 3550.84,439.84 3641,530 3582,589
  rectangle net VCC_3.3V: 3490,438 3994.66,548.66
  region net VCC_3.3V: 3904.5,458.5 4057.5,305.5 4147.66,395.66 3994.66,548.66
  rectangle net VCC_3.3V: 4055,74 4148,395
  rectangle net VCC_3.3V: 3210,503 3582,595
  region net VCC_3.3V: 3210,503 3295.56,588.56 3130.56,753.56 3045,668
  region net VCC_5V: 4058,540 4160.5,437.5 4246.77,523.77 4144.27,626.27
  rectangle net VCC_3.3V: 3092,711 3410,750
  rectangle net NetD8_1: 4334,1792 4684,1931
  rectangle net VIN1_12V: 2847,1694 4232,1840
  rectangle net VIN1_12V: 4121,1450 4241,1811
  rectangle net NetC65_1: 3942,1259 4060,1569
  rectangle net NetC65_1: 3822,1260 4116,1342
  rectangle net NetC65_1: 4100,1287.63 4202,1326
  rectangle net VCC_5V: 3767,746 4253,967
  rectangle net VCC_5V: 4058,540 4249,788
  rectangle net VCC_5V: 4160.5,437.5 4366,559.5
  rectangle net VCC_5V: 4258,40 4346,556
  region net VCC_5V: 4310,480 4365.5,535.5 4236.9,664.1 4181.4,608.6
  rectangle net VCC_5V: 3279,800 3865,1080
  rectangle net VCC_5V: 3478,755 3615,816
  rectangle net VCC_5V: 3279,800 3441,1148
  rectangle net VCC_5V: 3578,749 3815,821
  rectangle net VCC_3.3V: 2676,767 3141,1149
  rectangle net NetD11_2: 781,140 1731,331
  rectangle net NetD11_2: 579.6,146 692,466
  rectangle net NetD11_2: 604,142 931,386
  rectangle net NetQ2_3: 500.94,628 823,714.98
  rectangle net NetQ2_3: 759,471 823,714.98
  rectangle net NetQ2_1: 956,472 1028,714
  rectangle net VIN2_12V: 1065,700 1357,784
  rectangle net VIN2_12V: 1643,702 2060,837
  rectangle net VIN2_12V: 1726,812 1798,997
  rectangle net VIN2_12V: 1939,434 2066,833.55
  rectangle net VIN2_12V: 1938,434 2165,541
  rectangle net DVDD12: 1795,4070 2047,4106
  rectangle net USB_5V: 3237,3899 3638,3989
  rectangle net USB_5V: 3137.8,3899 3636,4217
  region net USB_5V: 3492.78,3962.78 3753,4223 3649.14,4326.86 3388.92,4066.65
  rectangle net NetC1_1: 3937,4210 4166,4309
  rectangle net NetC1_1: 3955,3936 4021,4238
  rectangle net VIN4_12V: 3955,3872 4143,3904
  rectangle net VIN4_12V: 4319,3320 4470,3945
  rectangle net VIN4_12V: 4092,3876 4471,3951
  rectangle net NetD1_1: 4531,3545 4736,3954
  rectangle net VIN4_12V: 4321,3310 4501,3468
  rectangle net NetP3_2: 4209,4588 4441,4959
  rectangle net NetP3_2: 4209,4563 4501,4785
  rectangle net NetD10_2: 4530.98,4068 4730,4812
  rectangle net NetD10_2: 4529,4002 4987,4292
  rectangle net NetD8_1: 4777,2088 4987,3950
  rectangle net NetD8_1: 4529,295 4739,2442
  rectangle net NetD8_1: 4323,1776 4533,2445
  rectangle net NetD8_1: 4550,2108 4895,2596
  rectangle net VIN5_12V: 4117,2730 4467,2795
  rectangle net VIN5_12V: 4287,2743 4470,2935
  rectangle net NetD8_1: 4569,64 4740,317
  rectangle net VBUS_OUT1: 1844.9,4621 1895,4999
Signal Layer 2:
  region net VDD33: 1654.98,4040.37 1707.3,4092.7 1686.15,4113.85 1633.82,4061.52
  rectangle net DVDD12: 1490.59,3830 1537,3881.65
Bottom Layer:
  rectangle net GND: 4168,248.43 4550.79,334
  rectangle net GND: 4364,55 4551,331
  rectangle net GND: 4168,68 4237,334
  rectangle net NetD8_1: 4565.71,68.29 4732.71,2148.29
  region net NetD8_1: 4565.71,2148.29 4713.5,2000.5 4959,2246 4811.21,2393.79
  rectangle net NetD8_1: 4792,2246 4959,3729
  rectangle net NetP3_2: 4259,4604 4495,4718
  rectangle net NetP3_2: 4259,4604 4405,4937
  rectangle net GND: 1460,3961 1522,4082
  rectangle net GND: 1682,4831 2205,4950
  rectangle net GND: 2666,4834 3167,4956
  rectangle net GND: 3626,4833 4163,4951
  rectangle net GND: 4110,5075 4552,5205
  rectangle net GND: 4096,4976 4549,5051
  rectangle net GND: 2826,1211 3434,1606
  rectangle net VDD33: 1634.45,3954 1673,4061
  region net VDD33: 1633,4019 1690.25,4076.25 1668.74,4097.76 1611.49,4040.51
  region net 5V: 1620,4062 1672.95,4114.95 1643.16,4144.74 1590.21,4091.79
  rectangle net NetD10_2: 4535,4119 4722,4717
  rectangle net GND: 3271,1456 3679,1600
  rectangle net GND: 674,4835 1197,4954
  rectangle net GND: 1792,4703 1877,4862

## Silkscreen, mask and mechanical layers (free items; w line width, h text height)
Top Overlay:
  drawing of 5038 lines, arcs and shapes, not listed
  text "DROP CONTROL BDNO4 V1.0" at 1223.2,3585.5 h70.87
Mechanical 1:
  circle w3.94: c925.2,3425.64 r64.96
  circle w3.94: c925.2,2440.64 r64.96
  circle w3.94: c2362.2,2831.64 r88.58
  circle w3.94: c3799.21,3425.64 r64.96
  circle w3.94: c3799.21,2440.64 r64.96
  lines w3.94: 2580,-125 cw(c2619.37,-125) 2619.37,-85.63 ; 4409.45,5255.91 4724.41,5255.91 ; 4724.41,5255.91 5039.37,4940.94 ; 4724.41,5255.91 0,5255.91 -314.96,4940.94 -314.96,4889.76 -39.37,4889.76 -39.37,4338.58 -314.96,4338.58 -314.96,1984.25 -39.37,1984.25 -39.37,1433.07 -314.96,1433.07 -314.96,1021 -39.37,1021 -39.37,469.82 -314.96,469.82 -314.96,314.96 0,0 4724.41,0 5039.37,314.96 5039.37,470 4763.78,470 4763.78,1021.18 5039.37,1021.18 5039.37,1433.07 4763.78,1433.07 4763.78,1984.25 5039.37,1984.25 5039.37,4338.58 4763.78,4338.58 4763.78,4889.76 5039.37,4889.76 5039.37,4940.94 ; 4724.41,5255.91 5039.37,4940.94

## Text inside footprints (layer, text, board x,y; h text height)
LED1: Top Overlay "+" at 1121.01,4641.08 h40
LED2: Top Overlay "+" at 1703.01,4642.08 h40
P2: Bottom Overlay "T+" at 589,4557 h31.5 r270; Bottom Overlay "T-" at 512,4557 h31.5 r270; Bottom Overlay "G" at 434,4559 h31.5 r270; Bottom Overlay "R+" at 354,4559 h31.5 r270; Bottom Overlay "R-" at 274,4558 h31.5 r270; Bottom Overlay "G" at 300,4653 h31.5 r270; Bottom Overlay "D+" at 392,4639 h31.5 r270; Bottom Overlay "D-" at 473,4643 h31.5 r270; Bottom Overlay "V" at 567,4651 h31.5 r270
P4: Bottom Overlay "T+" at 3555,4558 h31.5 r270; Bottom Overlay "T-" at 3474,4558 h31.5 r270; Bottom Overlay "G" at 3387,4565 h31.5 r270; Bottom Overlay "R+" at 3310,4557 h31.5 r270; Bottom Overlay "R-" at 3234,4560 h31.5 r270; Bottom Overlay "G" at 3253,4644 h31.5 r270; Bottom Overlay "D+" at 3345,4634 h31.5 r270; Bottom Overlay "D-" at 3435,4633 h31.5 r270; Bottom Overlay "V" at 3526,4640 h31.5 r270
P6: Bottom Overlay "T+" at 1578,4554 h31.5 r270; Bottom Overlay "T-" at 1491,4555 h31.5 r270; Bottom Overlay "G" at 1417,4555 h31.5 r270; Bottom Overlay "R+" at 1339,4556 h31.5 r270; Bottom Overlay "R-" at 1264,4558 h31.5 r270; Bottom Overlay "G" at 1287,4649 h31.5 r270; Bottom Overlay "D+" at 1377,4640 h31.5 r270; Bottom Overlay "D-" at 1459,4643 h31.5 r270; Bottom Overlay "V" at 1553,4643 h31.5 r270
P7: Bottom Overlay "T+" at 2571,4559 h31.5 r270; Bottom Overlay "T-" at 2480,4560 h31.5 r270; Bottom Overlay "G" at 2402,4562 h31.5 r270; Bottom Overlay "R+" at 2321,4554 h31.5 r270; Bottom Overlay "R-" at 2243,4554 h31.5 r270; Bottom Overlay "G" at 2266,4635 h31.5 r270; Bottom Overlay "D+" at 2361,4629 h31.5 r270; Bottom Overlay "D-" at 2439,4634 h31.5 r270; Bottom Overlay "V" at 2533,4640 h31.5 r270
P10: Top Overlay "20" at 4670.79,178.43 h62.99; Top Overlay "19" at 4665.79,78.43 h62.99; Top Overlay "15" at 4480.79,68.43 h40; Top Overlay "16" at 4480.79,188.43 h40; Top Overlay "1" at 3600.79,78.43 h62.99; Top Overlay "2" at 3600.79,178.43 h62.99
P30: Top Overlay "12" at 274.33,1903.58 h62.99 r90; Top Overlay "11" at 374.33,1903.58 h62.99 r90; Top Overlay "1" at 374.33,1238.58 h62.99 r90; Top Overlay "2" at 274.33,1238.58 h62.99 r90